# Altium PCB Square_2.PcbDoc
Units mil, origin at the board's own origin, x right, y up, seen from the top; angles counter-clockwise.
Board outline 4458.85 x 285.62 mil, 2 copper layers (Top Layer, Bottom Layer); 17 components, 12 nets, 36 pads, 21 vias.
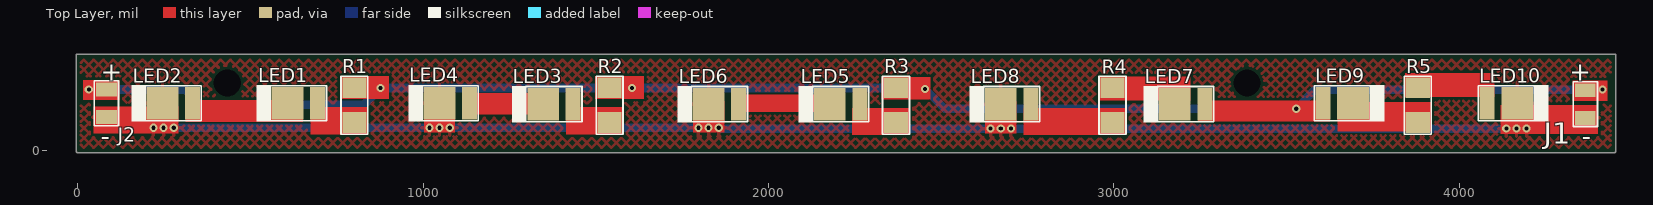
[diagram p0: Top Layer view]
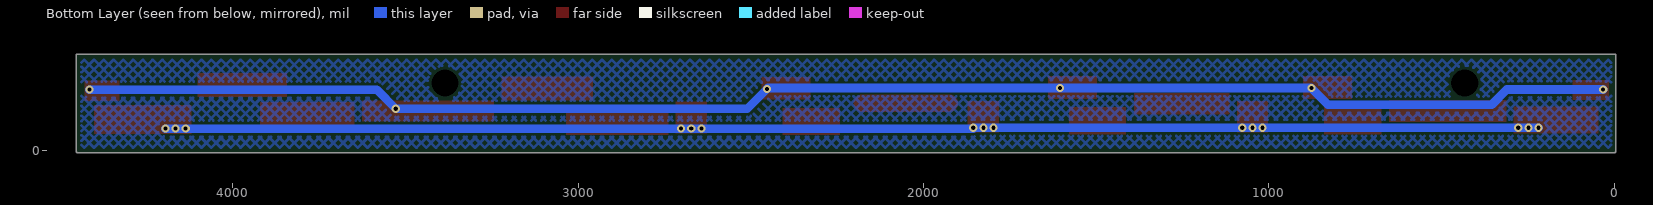
[diagram p1: Bottom Layer view, seen from below]

## Layer stack, top to bottom
Top Solder: solder mask 0.4, Solder Resist, Dk 3.5
Top Layer: signal copper 1.4
Dielectric 1: dielectric 12.6, FR-4, Dk 4.8
Bottom Layer: signal copper 1.4
Bottom Solder: solder mask 0.4, Solder Resist, Dk 3.5

## Board outline
0,-5.61 cw(c0,-0.59) -5.02,-0.59 -5.02,275 cw(c0,275) 0,280.01 4448.82,280.01 cw(c4448.82,275) 4453.83,275 4453.83,-0.59 cw(c4448.82,-0.59) 4448.82,-5.61

## Design rules (kind name [scope] priority, off if disabled: settings)
Clearance [All] p1: gap=7 ignorepadtopadclearanceinfootprint=FALSE except(0: Arc-Hole Track-Hole SMDPad-Hole THPad-Hole Via-Hole Fill-Hole Poly-Hole Region-Hole Text-Hole)
ComponentClearance [All] p1: gap=0 collisioncheckmode=3 verticalgap=0 showdistances=FALSE
HoleSize [All] p1: absolutevalues=TRUE maxlimit=1000 minlimit=1 maxpercent=80.000 minpercent=20.000
HoleToHoleClearance [All] p1: gap=0 allowstackedmicrovias=TRUE
MinimumSolderMaskSliver [All] p1: minsoldermaskwidth=0
PolygonConnect [All] p1: connectstyle=Relief reliefconductorwidth=10 reliefentries=4 polygonreliefangle="90 Angle" airgapwidth=10
RoutingVias [All] p1: holewidth=11.81 width=31.5 viastyle="Through Hole" minholewidth=7.87 minwidth=17.72 maxholewidth=11.81 maxwidth=31.5
SilkToSilkClearance [All] p1: silktosilkclearance=0
SilkToSolderMaskClearance [IsPad] p1: minsilkscreentomaskgap=0 clearancetoexposedcopper=TRUE
SolderMaskExpansion [All] p1: expansion=4
Width [All] p1: maxlimit=100 minlimit=10 preferedwidth=10 minimp=50.000000 maximp=50.000000 favimp=50.000000
24 further rules are at their usual default settings.

## Components (designator, comment, footprint, x,y, rotation, side; value= is the part's Value field where it differs from the comment)
J1 "SMD PADS" "SMD PAD" 4365,135 r270 top locked
J2 "SMD PADS" "SMD PAD" 83,137.41 r270 top locked
LED1 "White LED" "White LED" 651,137.41 r180 top locked value=Custom
LED2 "White LED" "White LED" 289,137.41 r180 top locked value=Custom
LED3 "White LED" "White LED" 1391,135 r180 top locked value=Custom
LED4 "White LED" "White LED" 1091,137.41 r180 top locked value=Custom
LED5 "White LED" "White LED" 2221,135 r180 top locked value=Custom
LED6 "White LED" "White LED" 1870,135 r180 top locked value=Custom
LED7 "White LED" "White LED" 3220,135 r180 top locked value=Custom
LED8 "White LED" "White LED" 2716,135 r180 top locked value=Custom
LED9 "White LED" "White LED" 3649,137.41 r0 top locked value=Custom
LED10 "White LED" "White LED" 4124,137.41 r0 top locked value=Custom
R1 "5R1" Res1206 801,132 r90 top locked
R2 "5R1" Res1206 1540,132 r90 top locked
R3 "5R1" Res1206 2369,132 r90 top locked
R4 "5R1" Res1206 2996,132 r90 top locked
R5 "5R1" Res1206 3880,132 r270 top locked

## Footprints (in the part's own frame and the unit in brackets; to place one, negate y for a bottom-side part, rotate by r counter-clockwise, add the part's x,y. Pads: shape width x height; smd on the part's side, far side on the other; paste and mask are expansions set on the pad)
Res1206 [mil]
  rect 60x70 smd: 1(-50,0) 2(50,0)
  silkscreen extent -84,-39 84,39, body extent -63,-31 63,32, height 39
"SMD PAD" [mil] "SMD 0805"
  rect 40x60 smd: 1(-40,0) 2(40,0)
  silkscreen extent -65,-35 65,35
"White LED" [mm]
  rect 2.33x2.38 smd: 1(1.108,0)
  rect 1.1x2.38 smd: 2(-1.107,0)
  silkscreen extent -1.75,-1.35 3.4,1.35

## Part data
J1 J2: library part "SMD PAD"
LED1 LED2 LED3 LED4 LED5 LED6 LED7 LED8 LED9 LED10: library part HL-AM-2835H421W-S1-08-HR6(SDCM<6)(2800K-3100K)60mA, "White 2800K~3100K 2.8V~3.4V SMD,3.5x2.8x0.7mm Light Emitting Diodes (LED) RoHS", Manufacturer="HONGLITRONIC(Hongli Zhihui (HONGLITRONIC))", Package=Custom, ComponentLink1Description="Supplier Link", ComponentLink1URL=https://lcsc.com/product-detail/Light-Emitting-Diodes-LED_HONGLITRONIC-Hongli-Zhihui-HONGLITRONIC-HL-AM-2835H421W-S1-08-HR6-SDCM-6-2800K-3100K-60mA_C516131.html, Manufacturer Part No=HL-AM-2835H421W-S1-08-HR6(SDCM<6)(2800K-3100K)60mA
R1 R2 R3 R4 R5: library part 1206W4J051JT5E, "RES SMD 5.1O ±5% 0.25W 1206", Manufacturer="UNI-ROYAL(Uniroyal Elec)", Package=1206, Power(Watts)=0.25W, Resistance=5.1O, Temperature Coefficient=±400ppm/?, Tolerance=±5%

## Free pads (board coordinates)
  round 0 hole 78.74 unplated: 1(433.07,196.26) 1(3385.83,196.26)

## Via types
v1: diameter 23.62, hole 11.81, Top Layer to Bottom Layer, tented both sides, 21 vias

## Nets (pads, with @x,y where several pads share a name; then routed paths per layer and width w, separated by ;. In a path a pad name is that pad's centre, name@x,y a point inside that pad or via, vN(x,y) a via of type N, cw(c..) or ccw(c..) an arc to the next point about the centre after c; other vN are vias at no path point)
GND: J1.2 J2.2 LED2.1 LED4.1 LED6.1 LED8.1 LED10.1 | length 4834.2
  Bottom Layer w25: v1@1856,64 v1(2702,64) v1(4195.2,64) ; v1(1856,66.41) v1(1077,66.41) ; v1(1077,66.41) v1(219,66.41) v1(1077,66.41)
  other v1: 2643,64 2672.5,64 4136.2,64 4165.7,64 248.5,66.41 278,66.41 1018,66.41 1047.5,66.41 1797,66.41 1826.5,66.41
LED_IN: J1.1 J2.1 LED7.2 LED9.2 R1.2 R2.2 R3.2 | length 4469.3
  Bottom Layer w25: v1(32,177.41) 311,177.41 355,133.41 829,133.41 v1(877,181.41) v1(1605,181.41) 2450.59,181.41 v1(2453,179) 2511,121 3527,121 3583,177 v1(4415,177)
  other v1: 3528,121.41
NetLED1_1: LED1.1 LED2.2
NetLED1_2: LED1.2 R1.1
NetLED3_1: LED3.1 LED4.2
NetLED3_2: LED3.2 R2.1
NetLED5_1: LED5.1 LED6.2 | length 252.4
  Top Layer w50: LED6.2@1925,137.41 LED5.1@2177.4,137.41
NetLED5_2: LED5.2 R3.1
NetLED7_1: LED7.1 R4.2
NetLED8_2: LED8.2 R4.1
NetLED9_1: LED9.1 R5.2
NetLED10_2: LED10.2 R5.1

## Polygon pours and split planes (outlines as drawn)
GND on Top Layer "GND_L01_P000" (hatched 45Degree grid 20 track 8, remove dead copper, pour order 0): 9,262.41 4438,262.41 4438,9.41 9,9.41
no net on Bottom Layer "NONET_L02_P004" (hatched 45Degree grid 20 track 8, remove dead copper, pour order 4): 9,262.41 4438,262.41 4438,9.41 9,9.41

## Other copper
Top Layer:
  rectangle net LED_IN: 4328,144 4429,203
  region net LED_IN: 121,204.41 15,204.41 15,146.41 121,146.41
  rectangle net NetLED9_1: 3647.4,55 3920.4,141
  region net NetLED10_2: 4101.4,225 3842.4,225 3842.4,155 4101.4,155
  rectangle net LED_IN: 3243,84 3626,145
  rectangle net NetLED5_2: 2242,45 2408,124
  rectangle net NetLED8_2: 2738,45 3035,124
  rectangle net GND: 4120,49 4402,133
  region net NetLED7_1: 3222,215 2957,215 2957,145 3222,145
  rectangle net GND: 2627,50 2718,142
  rectangle net LED_IN: 2327,148 2469,214
  rectangle net NetLED3_2: 1413,47.41 1579,126.41
  rectangle net NetLED1_2: 674,47.41 840,126.41
  rectangle net GND: 1002,52.41 1093,144.41
  rectangle net GND: 1781,52.41 1872,144.41
  rectangle net LED_IN: 1498,150.41 1640,216.41
  rectangle net LED_IN: 759,150.41 901,216.41
  rectangle net NetLED3_1: 1114,105.41 1391,166.41
  rectangle net GND: 46,49.41 292,128.41
  rectangle net NetLED1_1: 312,83.41 652,146.41

## Silkscreen, mask and mechanical layers (free items; w line width, h text height)
Top Overlay:
  text "+" at 67,202.41 h55
  text "+" at 4381.82,202.41 h55
  text "-" at 67,16.41 h55
  text "-" at 4381.82,16.41 h55
Mechanical 2:
  lines w10: 3385.83,275 4448.82,275 ; 4448.82,137.2 0,137.2 0,275 ; 0,275 0,-0.59 4448.82,-0.59 4448.82,275 ; 0,275 4448.82,275